# Altium PCB MiniPC.PcbDoc (part 22 of 24)
Units mm, origin at the board's own origin, x right, y up, seen from the top; angles counter-clockwise.
Board outline 175 x 155 mm, 16 copper layers (1_Top, 2_int1_(gnd), 3_int2_(power), 4_int3_(gnd), 5_int4_(sign), 6_int5_(power), 7_int6_(sign), 8_int7_(power), 9_int8_(gnd), 10_int9_(sign), 11_int10_(gnd), 12_int11_(sign), 13_int12_(gnd), 14_int13_(power), 15_int14_(gnd), 16_Bottom), stack 2.008 mm thick; 1046 components, 837 nets, 6010 pads, 4009 vias.
Unrouted connection lines stored in the file: 564.
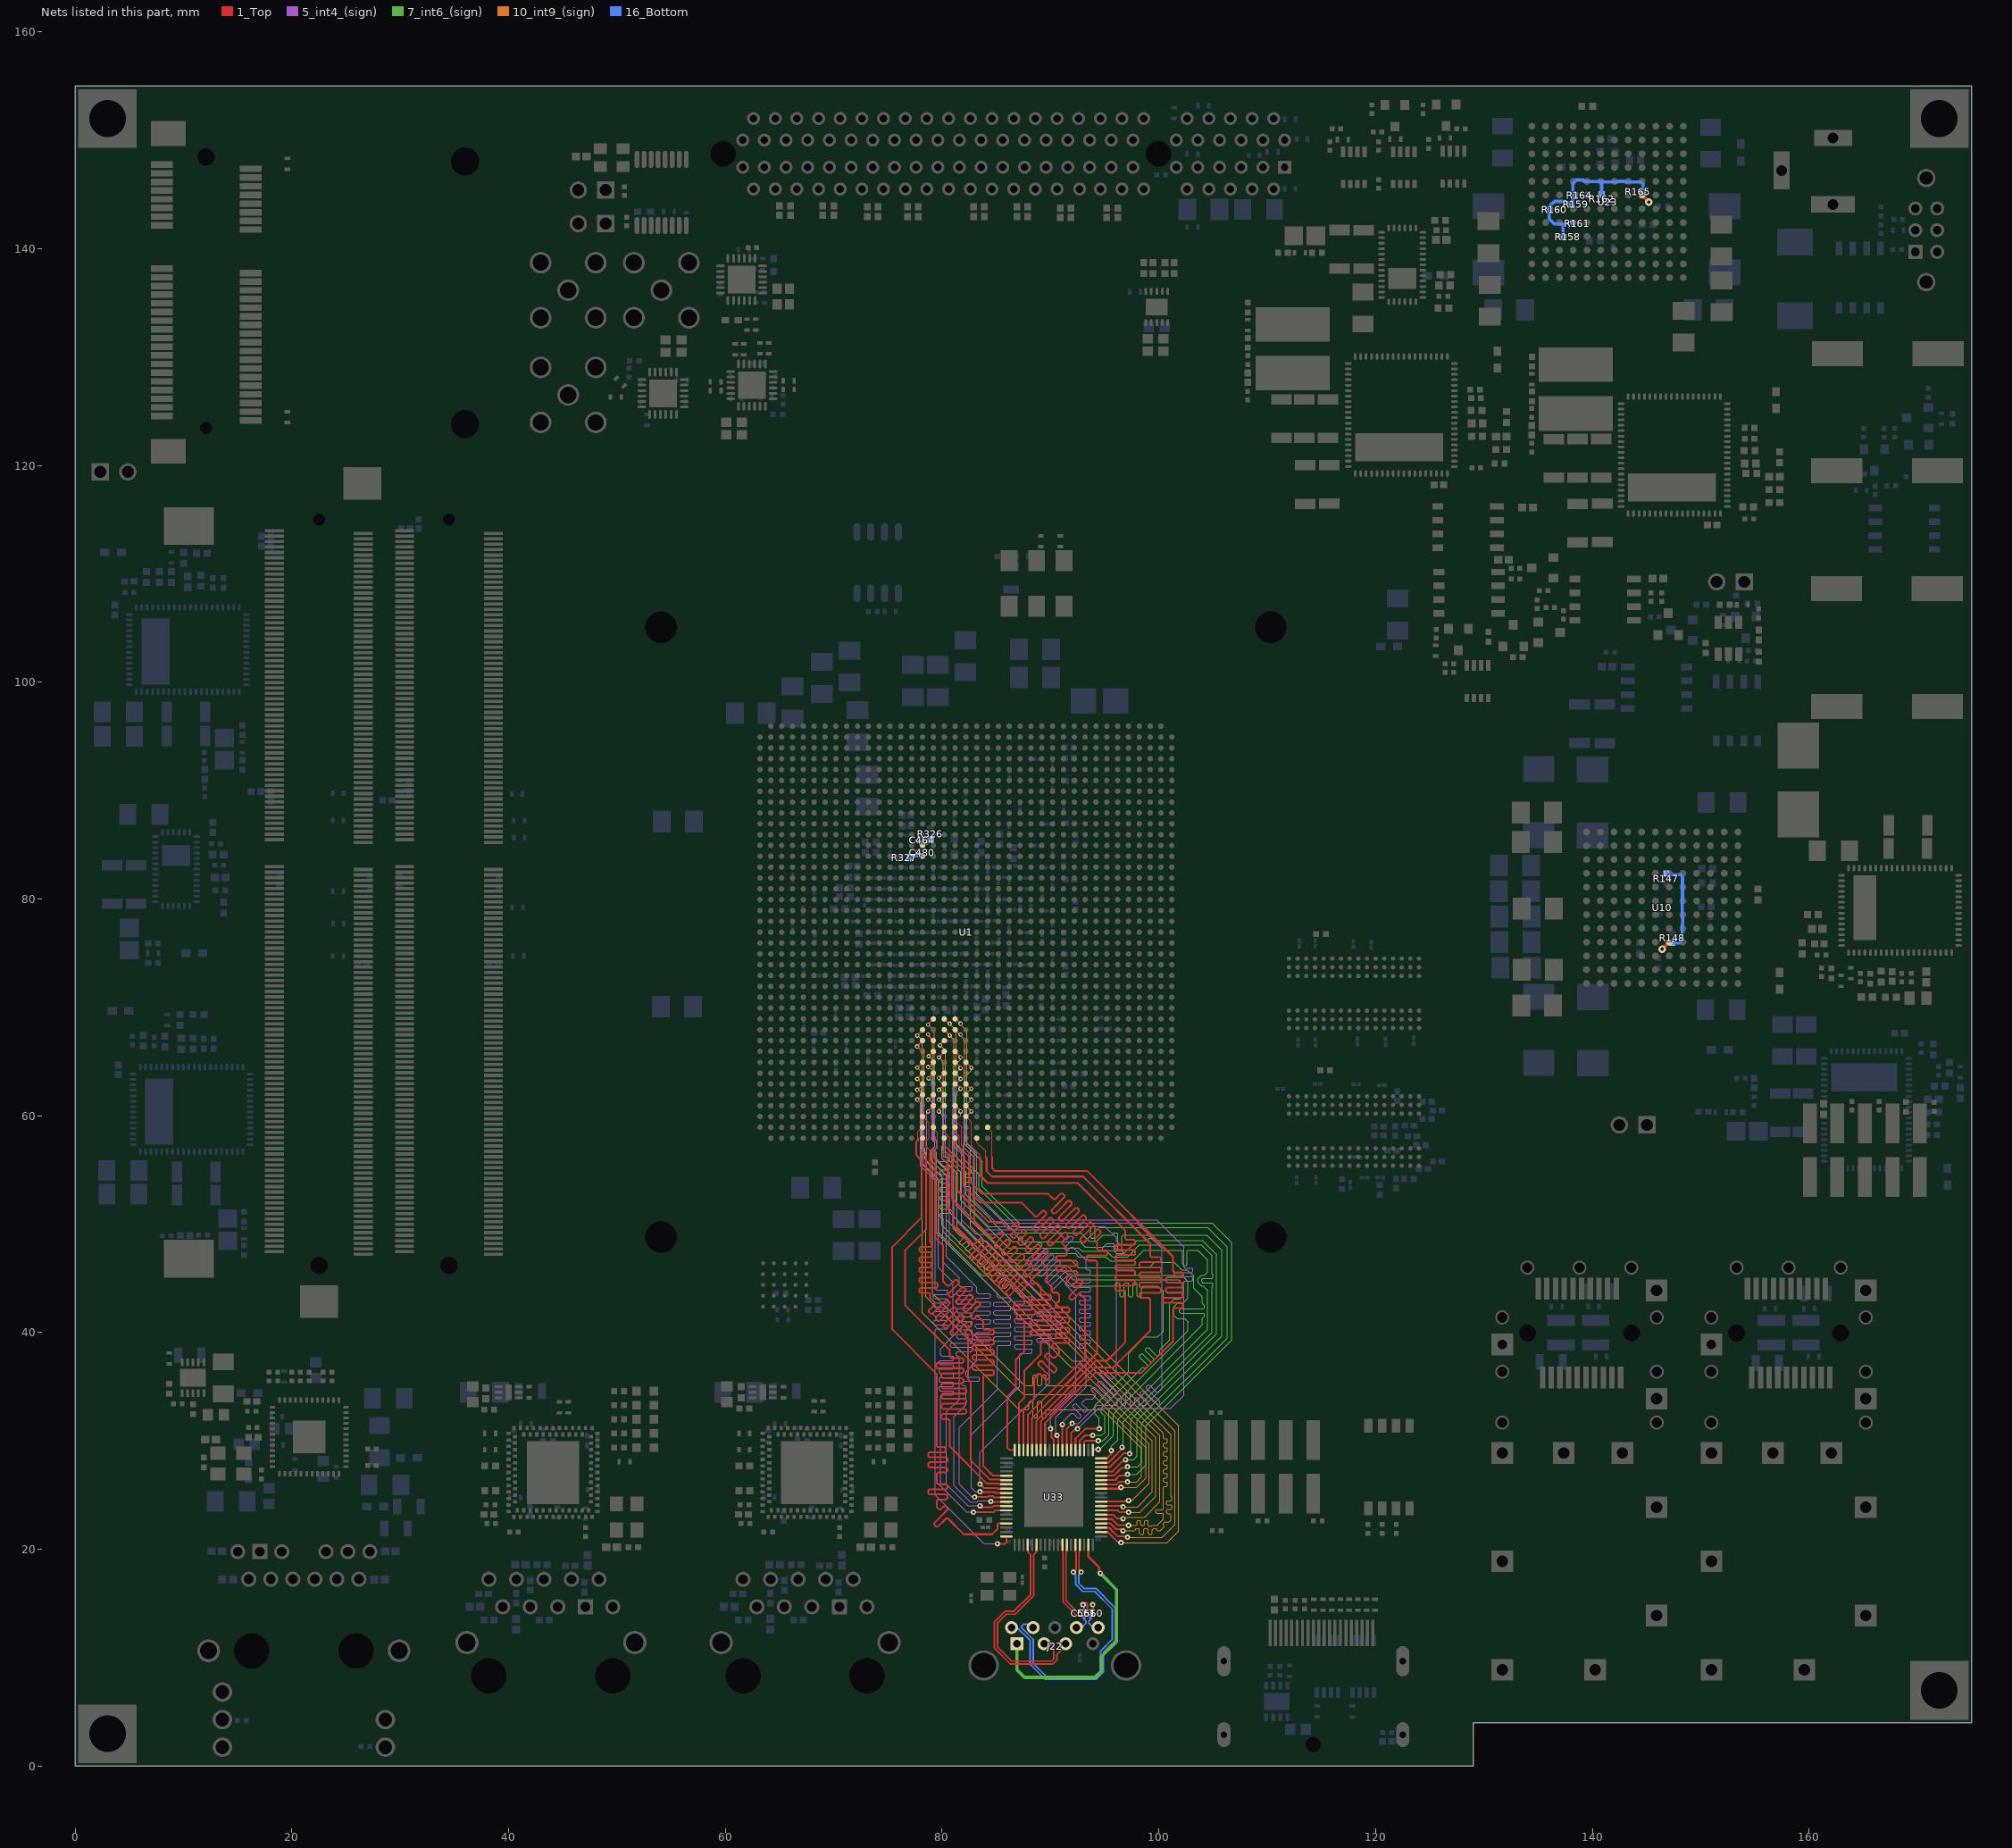
[diagram p34: the nets of this part, all layers, seen from the top]

## Via types
v1: diameter 0.4, hole 0.2, 1_Top to 16_Bottom, tented both sides, 1658 vias
v2: diameter 0.5, hole 0.2, 1_Top to 16_Bottom, tented both sides, 1014 vias
v3: diameter 0.7, hole 0.3, 1_Top to 16_Bottom, tented both sides, 915 vias
v4: diameter 0.6, hole 0.2, 1_Top to 16_Bottom, tented both sides, 278 vias
v5: diameter 0.4, hole 0.2, 1_Top to 16_Bottom, 93 vias
v6: diameter 0.4/0/0/0/0/0/0/0/0/0/0/0/0/0/0/0.4 (per signal layer), hole 0.2, 1_Top to 16_Bottom, tented both sides, 18 vias
v7: diameter 0.4/0/0/0/0/0/0/0/0/0/0/0.4/0.4/0.4/0.4/0.4 (per signal layer), hole 0.2, 1_Top to 16_Bottom, tented both sides, 16 vias
v8: diameter 0.5, hole 0.254, 1_Top to 16_Bottom, tented both sides, 15 vias
v9: diameter 0.5, hole 0.2, 1_Top to 16_Bottom, 2 vias

## Nets (pads, with @x,y where several pads share a name; then routed paths per layer and width w, separated by ;. In a path a pad name is that pad's centre, name@x,y a point inside that pad or via, vN(x,y) a via of type N, cw(c..) or ccw(c..) an arc to the next point about the centre after c; other vN are vias at no path point) (continued)
USB3_BE1: U1.AV17 U33.5 | length 62.9
  1_Top w0.1: U1.AV17@79.194,58.939 79.194,58.806 79.584,58.416 79.584,57.219 79.4,57.035 79.4,56.2
  1_Top w0.17: 79.4,56.2 79.4,48.7 80.1,48 80.1,44.7 80.4,44.4 80.483,44.317 80.649,44.317 81.178,44.846 81.344,44.846 81.51,44.68 81.51,44.513 80.899,43.901 80.612,43.615 80.612,43.449 80.778,43.283 80.944,43.283 81.231,43.569 81.843,44.181 82.009,44.181 82.175,44.015 82.175,43.849 81.563,43.237 81.277,42.95 81.277,42.784 81.443,42.618 81.609,42.618 81.896,42.904 82.507,43.516 82.674,43.516 82.84,43.35 82.84,43.184 82.228,42.572 81.941,42.286 81.941,42.119 82.107,41.953 82.274,41.953 82.56,42.24 83.172,42.852 83.338,42.852 83.504,42.686 83.504,42.519 82.893,41.907 82.606,41.621 82.606,41.455 82.772,41.289 82.938,41.289 83.142,41.492 83.308,41.492 83.557,41.243 83.8,41 83.8,40.765 83.8,40.413 83.918,40.295 84.665,40.295 84.783,40.178 84.783,39.943 84.665,39.825 83.8,39.825 82.935,39.825 82.817,39.708 82.817,39.473 82.935,39.355 83.8,39.355 84.665,39.355 84.783,39.238 84.783,39.003 84.665,38.885 83.8,38.885 82.935,38.885 82.817,38.768 82.817,38.533 82.935,38.415 83.8,38.415 84.665,38.415 84.783,38.298 84.783,38.063 84.665,37.945 83.8,37.945 82.935,37.945 82.817,37.828 82.817,37.593 82.935,37.475 83.8,37.475 84.665,37.475 84.783,37.358 84.783,37.123 84.665,37.005 83.8,37.005 82.935,37.005 82.817,36.888 82.817,36.653 82.935,36.535 83.8,36.535 84.665,36.535 84.783,36.418 84.783,36.183 84.665,36.065 83.918,36.065 83.8,35.948 83.8,35.6 83.8,27.7 84.695,26.805 85.92,26.805 U33.5@85.925,26.8
USB3_BE2: U1.AU16 U33.6 | length 63.5
  1_Top w0.1: U1.AU16@78.194,59.939 78.775,59.358 78.775,57.945 78.525,57.695 78.525,57.143 78.9,56.768
  1_Top w0.17: 78.9,56.768 78.9,48.6 78.9,48.378 78.913,48.365 79.03,48.248 79.03,48.013 78.913,47.895 78.9,47.895 78.017,47.895 77.9,47.778 77.9,47.543 78.017,47.425 78.9,47.425 78.913,47.425 79.03,47.308 79.03,47.073 78.913,46.955 78.9,46.955 78.017,46.955 77.9,46.838 77.9,46.603 78.017,46.485 78.9,46.485 78.913,46.485 79.03,46.368 79.03,46.133 78.913,46.015 78.9,46.015 78.017,46.015 77.9,45.898 77.9,45.663 78.017,45.545 78.9,45.545 78.913,45.545 79.03,45.428 79.03,45.193 78.913,45.075 78.9,45.075 78.017,45.075 77.9,44.958 77.9,44.723 78.017,44.605 78.9,44.605 79.472,44.605 79.589,44.488 79.589,44.253 79.472,44.135 78.9,44.135 78.017,44.135 77.9,44.018 77.9,43.783 78.017,43.665 78.782,43.665 78.9,43.548 78.9,43.2 79.066,43.034 79.315,42.785 79.315,42.618 78.774,42.077 78.774,41.911 78.941,41.745 79.107,41.745 79.731,42.369 80.355,42.993 80.521,42.993 80.687,42.827 80.687,42.661 80.063,42.037 79.439,41.413 79.439,41.247 79.605,41.08 79.772,41.08 80.396,41.704 81.02,42.328 81.186,42.328 81.352,42.162 81.352,41.996 80.728,41.372 80.104,40.748 80.104,40.582 80.27,40.416 80.436,40.416 81.06,41.04 81.684,41.664 81.85,41.664 82.017,41.498 82.017,41.331 81.393,40.707 80.769,40.083 80.769,39.917 80.935,39.751 81.101,39.751 81.725,40.375 82.349,40.999 82.515,40.999 82.681,40.833 82.681,40.667 82.14,40.126 82.14,39.96 82.39,39.71 82.4,39.7 82.4,39.465 82.4,39.2 82.4,35.7 82.65,35.45 82.65,28.203 84.418,26.435 85.305,26.435 85.34,26.4 U33.6@85.925,26.4
USB3_BE3: U1.AW16 U33.7 | length 62.8
  1_Top w0.1: U1.AW16@78.194,57.939 78.196,57.938 78.196,56.596
  1_Top w0.17: 78.196,56.596 78.53,56.261 78.53,49.53 76.6,47.6 76.6,42.5 80.7,38.4 80.7,37.9 80.7,37.783 80.818,37.665 81.848,37.665 81.966,37.548 81.966,37.313 81.848,37.195 80.7,37.195 79.562,37.195 79.445,37.078 79.445,36.843 79.562,36.725 80.7,36.725 81.848,36.725 81.966,36.608 81.966,36.373 81.848,36.255 80.7,36.255 80.052,36.255 79.934,36.138 79.934,35.903 80.052,35.785 80.7,35.785 81.85,35.785 81.967,35.668 81.967,35.433 81.85,35.315 80.7,35.315 80.052,35.315 79.934,35.198 79.934,34.963 80.052,34.845 80.7,34.845 82.098,34.845 82.216,34.728 82.216,34.493 82.098,34.375 80.7,34.375 80.052,34.375 79.934,34.258 79.934,34.023 80.052,33.905 80.7,33.905 82.098,33.905 82.216,33.788 82.216,33.553 82.098,33.435 80.7,33.435 80.052,33.435 79.934,33.318 79.934,33.083 80.052,32.965 80.7,32.965 82.098,32.965 82.216,32.848 82.216,32.613 82.098,32.495 80.7,32.495 80.052,32.495 79.934,32.378 79.934,32.143 80.052,32.025 80.583,32.025 80.7,31.908 80.7,31.6 80.7,29.511 84.146,26.065 85.151,26.065 85.186,26.03 85.895,26.03 U33.7@85.925,26
USB3_CLK: U1.AL17 U33.58 | length 66.8
  1_Top w0.17: v1(78.75,65.5) 78.755,65.5 U1.AL17@79.194,65.939 ; U33.58@93.9,29.175 93.95,29.225 v2(94.4,29.225)
  7_int6_(sign) w0.1: v1(78.75,65.5) 78.8,65.5 79.3,65 79.3,57.878 79.525,57.653 79.525,57.072 79.3,56.847 79.3,56.1 80.7,54.7 80.7,51.1 85.1,46.7 91.9,46.7 92.6,46 99.1,46 99.6,46.5 101.4,46.5 102.1,45.8 102.6,45.8 103.2,45.2 103.2,44.1 104,43.3 104,42.8 104,42.7 104.1,42.6 104.2,42.5 104.2,42.3 104.1,42.2 104,42.2 102.014,42.2 101.914,42.1 101.914,41.9 102.014,41.8 104,41.8 104.1,41.8 104.2,41.7 104.2,41.5 104.1,41.4 104,41.3 104,40.7 95.8,32.5 95.8,30.5 94.525,29.225 v2(94.4,29.225)
USB3_D0: U1.AH19 U33.40 | length 63.8
  1_Top w0.17: U1.AH19@81.194,68.939 81.261,68.939 v1(81.7,68.5) ; U33.40@94.675,21.6 95.284,21.6 96.179,20.704 96.421,20.704 v2(96.5,20.625)
  10_int9_(sign) w0.1: v1(81.7,68.5) 81.7,68.4 82.3,67.8 82.3,57.483 83,56.783 83,50.2 101.8,31.4 101.8,21.7 100.725,20.625 v2(96.5,20.625)
USB3_D1: U1.AJ19 U33.41 | length 63.6
  1_Top w0.17: U1.AJ19@81.194,67.939 81.633,67.5 v1(81.7,67.5) ; U33.41@94.675,22 95.407,22 96.207,21.2 97.025,21.2 v2(97.1,21.125)
  10_int9_(sign) w0.1: v1(81.7,67.5) 81.7,67.4 82.1,67 82.1,57.4 82.6,56.9 82.6,55.3 82.6,55.1 82.7,55 82.7,54.8 82.6,54.7 82.2,54.7 82.1,54.6 82.1,54.4 82.2,54.3 82.6,54.3 82.7,54.2 82.7,54 82.6,53.9 82.2,53.9 82.1,53.8 82.1,53.6 82.2,53.5 82.5,53.5 82.6,53.4 82.6,53.3 82.6,49.8 101.5,30.9 101.5,22.324 100.276,21.1 97.125,21.1 v2(97.1,21.125)
USB3_D2: U1.AH18 U33.42 | length 65.6
  1_Top w0.17: U1.AH18@80.194,68.939 80.633,68.5 v1(80.7,68.5) ; U33.42@94.675,22.4 95.53,22.4 96.055,21.875 96.55,21.875 v2(96.7,21.725)
  10_int9_(sign) w0.1: v1(80.7,68.5) 81.3,67.9 81.3,57.3 81.8,56.8 81.8,49.9 101.1,30.6 101.1,25.1 101.1,24.9 101.2,24.8 101.2,24.6 101.1,24.5 100.8,24.5 100.7,24.4 100.7,24.2 100.8,24.1 101.1,24.1 101.2,24 101.2,23.8 101.1,23.7 100.8,23.7 100.7,23.6 100.7,23.4 100.8,23.3 101,23.3 101.1,23.2 101.1,22.9 101.1,22.7 100.903,22.503 100.761,22.503 100.715,22.549 100.573,22.549 100.432,22.408 100.432,22.266 100.479,22.22 100.479,22.079 100.266,21.866 100.125,21.725 99.9,21.725 99.8,21.825 99.7,21.925 99.5,21.925 99.4,21.825 99.4,21.725 99.4,21.5 99.3,21.4 99.1,21.4 99,21.5 99,21.725 99,21.825 98.9,21.925 98.7,21.925 98.6,21.825 98.6,21.725 98.6,21.5 98.5,21.4 98.3,21.4 98.2,21.5 98.2,21.725 98.2,21.825 98.1,21.925 97.9,21.925 97.8,21.825 97.7,21.725 97.6,21.725 v2(96.7,21.725)
USB3_D3: U1.AJ18 U33.43 | length 65.8
  1_Top w0.17: U1.AJ18@80.194,67.939 80.7,67.433 v1(80.7,67.4) ; U33.43@94.675,22.8 95.653,22.8 96.208,22.245 97.18,22.245 v2(97.2,22.225)
  10_int9_(sign) w0.1: v1(80.7,67.4) 81.1,67 81.1,57.2 81.4,56.9 81.4,49.7 100.4,30.7 100.4,30.4 100.4,30.3 100.5,30.2 100.7,30.2 100.8,30.1 100.8,29.9 100.7,29.8 100.5,29.8 100.4,29.7 100.4,29.5 100.5,29.4 100.7,29.4 100.8,29.3 100.8,29.1 100.7,29 100.5,29 100.4,28.9 100.4,28.7 100.5,28.6 100.7,28.6 100.8,28.5 100.8,28.3 100.7,28.2 100.5,28.2 100.4,28.1 100.4,27.9 100.5,27.8 100.7,27.8 100.8,27.7 100.8,27.5 100.7,27.4 100.5,27.4 100.4,27.3 100.4,27.1 100.5,27 100.7,27 100.8,26.9 100.8,26.7 100.7,26.6 100.5,26.6 100.4,26.5 100.4,26.3 100.5,26.2 100.7,26.2 100.8,26.1 100.8,25.9 100.7,25.8 100.5,25.8 100.4,25.7 100.4,25.5 100.4,24.1 100.4,24.025 100.4,23.762 100.312,23.675 99.799,23.675 99.712,23.587 99.712,23.412 99.799,23.325 100.312,23.325 100.4,23.237 100.4,22.975 100.4,22.8 99.825,22.225 99.725,22.225 99.376,22.225 ; v2(97.2,22.225) 97.8,22.225 97.887,22.225 97.975,22.313 97.975,22.588 98.062,22.675 98.237,22.675 98.325,22.588 98.325,22.313 98.412,22.225 98.587,22.225 98.675,22.313 98.675,22.601 98.762,22.688 98.937,22.688 99.025,22.601 99.025,22.225 ; 99.025,22.224 99.112,22.137 99.287,22.137 99.375,22.224
USB3_D4: U1.AK18 U33.44 | length 65.6
  1_Top w0.17: v1(79.8,66.5) 79.8,66.545 U1.AK18@80.194,66.939 ; U33.44@94.675,23.2 95.777,23.2 96.104,22.872 96.653,22.872 v2(96.7,22.825)
  10_int9_(sign) w0.1: v1(79.8,66.5) 80.3,66 80.3,57.139 81,56.439 81,49.6 81.5,49.1 81.641,48.959 81.717,48.959 81.924,48.752 81.924,48.676 81.607,48.359 81.607,48.217 81.749,48.076 81.89,48.076 82.207,48.393 82.283,48.393 82.49,48.186 82.49,48.11 82.173,47.793 82.173,47.651 82.314,47.51 82.456,47.51 82.773,47.827 82.849,47.827 83.056,47.62 83.056,47.544 82.738,47.227 82.738,47.086 82.88,46.944 83.021,46.944 83.338,47.262 83.414,47.262 83.621,47.054 83.621,46.979 83.304,46.661 83.304,46.52 83.446,46.379 83.587,46.379 83.904,46.696 83.98,46.696 84.187,46.489 84.187,46.413 83.87,46.096 83.87,45.954 84.011,45.813 84.153,45.813 84.47,46.13 84.546,46.13 84.753,45.923 84.753,45.847 84.436,45.53 84.436,45.389 84.577,45.247 84.718,45.247 85.036,45.564 85.111,45.564 85.318,45.357 85.318,45.282 85.001,44.964 85.001,44.823 85.143,44.682 85.284,44.682 85.601,44.999 85.677,44.999 85.884,44.792 85.884,44.716 85.567,44.399 85.567,44.257 85.708,44.116 85.85,44.116 86.167,44.433 86.243,44.433 86.45,44.226 86.45,44.15 86.8,43.8 100.1,30.5 100.1,24.4 98.675,22.975 96.85,22.975 v2(96.7,22.825)
USB3_D5: U1.AL18 U33.45 | length 66.4
  1_Top w0.17: v1(79.7,65.4) 80.194,65.894 U1.AL18@80.194,65.939 ; U33.45@94.675,23.6 96.2,23.6 96.375,23.425 v2(97.2,23.425)
  10_int9_(sign) w0.1: v1(79.7,65.4) 80.1,65 80.1,56.4 80.1,56.3 80.2,56.2 80.6,56.2 80.7,56.1 80.7,55.9 80.6,55.8 80.1,55.8 79.9,55.8 79.8,55.7 79.8,55.5 79.9,55.4 80.1,55.4 80.6,55.4 80.7,55.3 80.7,55.1 80.6,55 80.1,55 79.9,55 79.8,54.9 79.8,54.7 79.9,54.6 80.1,54.6 80.6,54.6 80.7,54.5 80.7,54.3 80.6,54.2 80.1,54.2 79.9,54.2 79.8,54.1 79.8,53.9 79.9,53.8 80.1,53.8 80.6,53.8 80.7,53.7 80.7,53.5 80.6,53.4 80.1,53.4 79.9,53.4 79.8,53.3 79.8,53.1 79.9,53 80.1,53 80.6,53 80.7,52.9 80.7,52.7 80.6,52.6 80.1,52.6 79.9,52.6 79.8,52.5 79.8,52.3 79.9,52.2 80.1,52.2 80.6,52.2 80.7,52.1 80.7,51.9 80.6,51.8 80.1,51.8 79.9,51.8 79.8,51.7 79.8,51.5 79.9,51.4 80.1,51.4 80.6,51.4 80.7,51.3 80.7,51.1 80.6,51 80.1,51 79.9,51 79.8,50.9 79.8,50.7 79.9,50.6 80,50.6 80.1,50.5 80.1,50.4 80.1,49.3 92,37.4 92.6,37.4 99.7,30.3 99.7,24.9 98.225,23.425 v2(97.2,23.425)
USB3_D6: U1.AH17 U33.46 | length 58.3
  1_Top w0.17: v1(78.7,68.4) 78.7,68.445 U1.AH17@79.194,68.939 ; U33.46@94.675,24 96.625,24 v2(96.7,23.925)
  10_int9_(sign) w0.1: v1(78.7,68.4) 79.3,67.8 79.3,57.878 79.525,57.653 79.525,57.072 79.3,56.847 79.3,56.8 79.5,56.6 79.5,49.2 91.9,36.8 92.6,36.8 99.4,30 99.4,25.3 98.025,23.925 v2(96.7,23.925)
USB3_D7: U1.AK17 U33.47 | length 63
  1_Top w0.17: v1(78.7,67.5) 78.7,67.433 U1.AK17@79.194,66.939 ; U33.47@94.675,24.4 94.685,24.41 97.085,24.41 v2(97.2,24.525)
  10_int9_(sign) w0.1: v1(78.7,67.5) 78.7,67.4 79.1,67 79.1,57.795 79.325,57.57 79.325,57.155 79.1,56.93 79.1,43.6 87.6,35.1 88.2,35.1 88.3,35.1 88.4,35.2 88.4,36 88.5,36.1 88.7,36.1 88.8,36 88.8,35.2 88.9,35.1 89.1,35.1 89.2,35.2 89.2,36 89.3,36.1 89.5,36.1 89.6,36 89.6,35.2 89.7,35.1 89.9,35.1 93.7,35.1 99.1,29.7 99.1,26.1 97.525,24.525 v2(97.2,24.525)
USB3_D8: U1.AJ16 U33.50 | length 58.6
  1_Top w0.17: v1(77.7,67.4) 78.194,67.894 U1.AJ16@78.194,67.939 ; U33.50@94.675,25.6 96.375,25.6 v2(96.5,25.725)
  10_int9_(sign) w0.1: v1(77.7,67.4) 78.155,66.945 78.155,66.245 78.35,66.05 78.35,56.75 78.5,56.6 78.5,43.3 87.5,34.3 93.9,34.3 98.8,29.4 98.8,26.6 97.925,25.725 v2(96.5,25.725)
USB3_D9: U1.AK16 U33.51 | length 63.1
  1_Top w0.17: v1(77.7,66.4) 77.7,66.445 U1.AK16@78.194,66.939 ; U33.51@94.675,26 96.089,26 96.314,26.225 v2(97.1,26.225)
  10_int9_(sign) w0.1: v1(77.7,66.4) 78.15,65.95 78.15,41.85 87.1,32.9 87.8,32.9 87.9,32.9 88,33 88,33.566 88.1,33.666 88.3,33.666 88.4,33.566 88.4,32.9 88.4,32.234 88.5,32.134 88.7,32.134 88.8,32.234 88.8,32.9 88.8,33.566 88.9,33.666 89.1,33.666 89.2,33.566 89.2,32.9 89.2,32.234 89.3,32.134 89.5,32.134 89.6,32.234 89.6,32.9 94.8,32.9 98.4,29.3 98.4,26.7 97.925,26.225 v2(97.1,26.225)
USB3_D10: U1.AP20 U33.52 | length 64.1
  1_Top w0.17: U1.AP20@82.194,62.939 82.633,62.5 v1(82.7,62.5) ; U33.52@94.675,26.4 95.966,26.4 96.391,26.825 96.993,26.825 97.096,26.929 v2@97.1,26.932
  7_int6_(sign) w0.1: v1(82.7,62.5) 82.3,62.1 82.3,57.2 83.7,55.8 83.7,53.5 87.1,50.1 104.9,50.1 106.7,48.3 106.7,39.3 98.8,31.4 98.8,27.8 97.925,26.925 v2(97.1,26.925)
USB3_D11: U1.AM20 U33.53 | length 67.3
  1_Top w0.17: U1.AM20@82.194,64.939 v1(82.7,64.433) ; U33.53@94.675,26.8 95.843,26.8 96.567,27.525 97,27.525 v2(97.1,27.625)
  7_int6_(sign) w0.1: v1(82.7,64.433) 82.7,64.2 82.1,63.6 82.1,57.554 82,57.454 82,56 83.4,54.6 83.4,53.3 87,49.7 93.1,49.7 93.3,49.7 93.4,49.8 93.6,49.8 93.7,49.7 93.7,48.817 93.8,48.717 94,48.717 94.1,48.817 94.1,49.7 94.2,49.8 94.4,49.8 94.5,49.7 95.4,49.7 104.5,49.7 106.3,47.9 106.3,39.5 98.4,31.6 98.4,28 98.025,27.625 v2(97.1,27.625)
USB3_D12: U1.AM19 U33.54 | length 67.4
  1_Top w0.17: U1.AM19@81.194,64.939 81.7,64.433 v1(81.7,64.4) ; U33.54@94.675,27.2 95.719,27.2 96.794,28.275 v2(96.931,28.275)
  7_int6_(sign) w0.1: v1(81.7,64.4) 81.3,64 81.3,57.339 81.4,57.239 81.4,56.1 82.9,54.6 82.9,53.089 86.789,49.2 92.8,49.2 93.583,48.417 94.217,48.417 94.793,48.993 95.6,48.993 95.7,48.993 95.8,49.093 95.9,49.193 96.1,49.193 96.2,49.093 96.2,48.993 96.2,47.739 96.3,47.639 96.5,47.639 96.6,47.739 96.6,48.893 96.7,48.993 96.8,48.993 104.407,48.993 105.8,47.6 105.8,39.7 98,31.9 98,28.6 97.675,28.275 v2(96.931,28.275)
USB3_D13: U1.AL19 U33.55 | length 67.1
  1_Top w0.17: U1.AL19@81.194,65.939 81.7,65.433 v1(81.7,65.4) ; U33.55@94.675,27.6 95.475,27.6 96.737,28.863 97.263,28.863 v2(97.3,28.825)
  7_int6_(sign) w0.1: v1(81.7,65.4) 81.7,65.2 81.1,64.6 81.1,55.9 82.2,54.8 82.2,52.7 86.5,48.4 86.9,48.4 86.987,48.4 87.075,48.488 87.075,48.732 87.162,48.82 87.337,48.82 87.425,48.732 87.425,48.4 87.425,48.268 87.512,48.18 87.687,48.18 87.775,48.268 87.775,48.312 87.862,48.4 88.5,48.4 92.7,48.4 93.2,47.9 94.9,47.9 95.2,48.2 95.8,48.2 95.9,48.1 95.9,47.5 96.1,47.3 96.8,47.3 98,48.5 98.8,48.5 98.907,48.5 99,48.593 99.1,48.693 99.3,48.693 99.4,48.593 99.493,48.5 99.6,48.5 104,48.5 105.3,47.2 105.3,39.9 97.4,32 97.4,28.925 v2(97.3,28.825)
USB3_D14: U1.AN18 U33.56 | length 64.7
  1_Top w0.17: v1(79.7,63.5) 79.755,63.5 U1.AN18@80.194,63.939 ; U33.56@94.675,28 95.323,28 96.6,29.277 v2(96.6,29.425)
  7_int6_(sign) w0.1: v1(79.7,63.5) 79.7,63.288 80.3,62.688 80.3,57.2 80.3,56.2 81.7,54.8 81.7,52.2 86.1,47.8 92.6,47.8 92.9,47.5 95.2,47.5 95.7,47 97.1,47 98.2,48.1 103.9,48.1 104.9,47.1 104.9,45.6 104.9,45.4 105,45.3 105,45.1 104.9,45 104.049,45 103.949,44.9 103.949,44.7 104.049,44.6 104.9,44.6 105,44.5 105,44.3 104.9,44.2 104.9,44 104.9,40 96.7,31.8 96.7,29.525 v2(96.6,29.425)
USB3_D15: U1.AP18 U33.57 | length 64.6
  1_Top w0.17: v1(79.7,62.4) 80.194,62.894 U1.AP18@80.194,62.939 ; U33.57@94.675,28.4 95.2,28.4 95.6,28.8 v2(95.6,29.125)
  7_int6_(sign) w0.1: v1(79.7,62.4) 79.8,62.4 80.1,62.1 80.1,57.283 80,57.183 80,56.076 81.3,54.776 81.3,51.7 85.7,47.3 92.3,47.3 92.6,47 95.1,47 95.5,46.6 97.6,46.6 98.6,47.6 101.2,47.6 101.4,47.6 101.6,47.6 101.8,47.6 102.1,47.6 102.2,47.5 102.2,46.319 102.3,46.219 102.5,46.219 102.6,46.319 102.6,47.5 102.7,47.6 103.6,47.6 104.5,46.7 104.5,45.6 104.2,45.3 103.925,45.3 103.6,44.975 103.6,44.625 103.925,44.3 104.1,44.3 104.5,43.9 104.5,40.3 96.2,32 96.2,30.1 95.6,29.5 v2(95.6,29.125)
USB3_D16: U1.AM17 U33.60 | length 63.2
  1_Top w0.17: v1(78.7,64.5) 78.755,64.5 U1.AM17@79.194,64.939 ; U33.60@93.115,28.81 93.1,28.825 U33.60@93.1,29.175 93.1,29.912 93.213,30.025 v2(94.4,30.025)
  7_int6_(sign) w0.1: v1(78.7,64.5) 78.8,64.5 79.1,64.2 79.1,57.795 79.325,57.57 79.325,57.155 79.095,56.925 79.071,56.925 78.9,56.754 78.9,55.983 80.383,54.5 80.383,50.4 84.583,46.2 91.5,46.2 92.4,45.3 102.1,45.3 102.7,44.7 102.7,43.2 102.2,42.7 101.7,42.7 101.4,42.4 101.4,41.6 101.7,41.3 102.4,41.3 102.7,41 102.7,40.2 95.4,32.9 95.4,30.6 94.825,30.025 v2(94.4,30.025)
USB3_D17: U1.AM16 U33.61 | length 66.2
  1_Top w0.17: v1(77.7,64.445) U1.AM16@78.194,64.939 ; U33.61@92.7,29.175 92.7,30.038 93.187,30.525 v2(93.9,30.525)
  7_int6_(sign) w0.1: v1(77.7,64.445) 78.3,63.845 78.3,60.039 78.3,57.085 78.4,56.985 78.4,56 80,54.4 80,49.9 84.1,45.8 91.2,45.8 92.1,44.9 101.8,44.9 102.2,44.5 102.2,43.3 102,43.1 101.4,43.1 101,42.7 101,39.3 100.1,38.4 100.029,38.329 100.029,38.188 100.067,38.151 100.067,38.009 99.925,37.868 99.784,37.868 99.676,37.976 99.049,38.603 98.907,38.603 98.766,38.461 98.766,38.32 99.393,37.693 99.501,37.585 99.501,37.444 99.359,37.302 99.218,37.302 99.11,37.41 98.483,38.037 98.341,38.037 98.2,37.896 98.2,37.754 98.827,37.127 98.935,37.019 98.935,36.878 98.794,36.736 98.652,36.736 98.589,36.8 98.5,36.8 94.7,33 94.7,32.6 95,32.3 95,30.8 94.725,30.525 v2(93.9,30.525)
USB3_D18: U1.AN16 U33.62 | length 65.5
  1_Top w0.17: v1(77.7,63.4) 77.7,63.445 U1.AN16@78.194,63.939 ; U33.62@92.3,29.175 92.3,30.225 93.2,31.125 v2(94.5,31.125)
  7_int6_(sign) w0.1: v1(77.7,63.4) 78.1,63 78.1,56.961 78.05,56.911 78.05,55.65 79.7,54 79.7,49.2 83.6,45.3 90.7,45.3 91.7,44.3 95.8,44.3 95.9,44.3 96,44.4 96,44.5 96.1,44.6 96.3,44.6 96.4,44.5 96.4,44.3 96.4,43.4 96.5,43.3 96.7,43.3 96.8,43.4 96.8,44.3 96.8,44.5 96.9,44.6 97.1,44.6 97.2,44.5 97.2,44.3 97.2,43.4 97.3,43.3 97.5,43.3 97.6,43.4 97.6,44.3 97.6,44.5 97.7,44.6 97.9,44.6 98,44.5 98,44.3 98,43.4 98.1,43.3 98.3,43.3 98.4,43.4 98.4,44.2 98.5,44.3 98.7,44.3 99.9,44.3 100.4,43.8 100.4,40.1 99.9,39.6 98.7,39.6 97.2,38.1 97.2,36.4 94.1,33.3 94.1,32.5 94.5,32.1 v2(94.5,31.125)
USB3_D19: U1.AT20 U33.63 | length 61.8
  1_Top w0.17: U1.AT20@82.194,60.939 82.7,60.433 v1(82.7,60.4) ; U33.63@91.9,29.175 91.9,30.725 92.175,31 92.375,31 v2(92.5,31.125)
  5_int4_(sign) w0.1: v1(82.7,60.4) 82.25,59.95 82.25,57.489 83.2,56.539 83.2,52.6 85.4,50.4 99.79,50.4 102.3,47.89 102.3,46.16 102.3,46.06 102.4,45.96 103.042,45.96 103.142,45.86 103.142,45.66 103.042,45.56 102.3,45.56 101.558,45.56 101.458,45.46 101.458,45.26 101.558,45.16 102.3,45.16 103.042,45.16 103.142,45.06 103.142,44.86 103.042,44.76 102.4,44.76 102.3,44.66 102.3,43.56 102.3,34.23 101.07,33 94.4,33 92.525,31.125 v2(92.5,31.125)
USB3_D20: U1.AR20 U33.64 | length 65.1
  1_Top w0.17: U1.AR20@82.194,61.939 82.261,61.939 v1(82.7,61.5) ; U33.64@91.5,29.175 91.5,31.125 v2(92,31.625)
  5_int4_(sign) w0.1: v1(82.7,61.5) 82.2,61 82.2,60.183 82.05,60.033 82.05,57.05 82.9,56.2 82.9,52.2 85,50.1 97.97,50.1 100.3,47.77 100.3,37.01 100.3,36.81 100.3,36.41 100.3,36.01 100.3,35.61 100.3,35.21 100.3,34.84 100.159,34.699 99.946,34.486 99.805,34.486 99.13,35.161 98.989,35.161 98.848,35.02 98.848,34.878 99.593,34.133 100.072,33.654 100.072,33.512 99.931,33.371 99.789,33.371 99.31,33.85 98.565,34.595 98.423,34.595 98.282,34.454 98.282,34.312 98.957,33.638 98.957,33.496 98.76,33.3 98.56,33.3 98.26,33.3 98.16,33.4 98.16,33.91 98.06,34.01 97.86,34.01 97.76,33.91 97.76,33.4 97.66,33.3 97.46,33.3 97.36,33.4 97.36,34.354 97.26,34.454 97.06,34.454 96.96,34.354 96.96,33.4 96.86,33.3 96.66,33.3 96.56,33.4 96.56,33.862 96.46,33.962 96.26,33.962 96.16,33.862 96.16,33.4 96.06,33.3 95.14,33.3 94.276,33.3 92.601,31.625 v2(92,31.625)
USB3_D21: U1.AT19 U33.65 | length 64.1
  1_Top w0.17: U1.AT19@81.194,60.939 81.7,60.433 v1(81.7,60.4) ; U33.65@91.1,29.175 v2(91.1,31.525)
  5_int4_(sign) w0.1: v1(81.7,60.4) 81.7,60.045 81.35,59.695 81.35,57.35 82.5,56.2 82.5,51.6 84.3,49.8 95.03,49.8 96.07,48.76 96.07,48.56 96.07,48.46 96.17,48.36 96.222,48.36 96.322,48.26 96.322,48.06 96.222,47.96 96.07,47.96 94.916,47.96 94.816,47.86 94.816,47.66 94.916,47.56 96.07,47.56 96.606,47.56 96.706,47.46 96.706,47.26 96.606,47.16 96.17,47.16 96.07,47.06 96.07,46.87 96.07,36.07 95.929,35.929 95.716,35.716 95.575,35.716 94.83,36.462 94.688,36.462 94.547,36.32 94.547,36.179 95.363,35.363 96.179,34.547 96.179,34.405 96.037,34.264 95.896,34.264 95.08,35.08 94.638,35.522 94.497,35.522 94.355,35.381 94.355,35.239 94.797,34.797 95.613,33.981 95.613,33.84 95.472,33.698 95.33,33.698 94.514,34.514 94.081,34.948 93.939,34.948 93.798,34.807 93.798,34.665 94.161,34.302 94.161,34.161 93.949,33.949 93.9,33.9 93.28,33.9 93.139,33.759 92.926,33.546 92.926,33.405 93.371,32.961 93.371,32.819 93.229,32.678 93.088,32.678 92.573,33.193 92.352,33.414 92.211,33.414 92.069,33.272 92.069,33.131 92.29,32.91 92.805,32.395 92.805,32.254 92.664,32.112 92.522,32.112 92.078,32.557 91.936,32.557 91.78,32.4 91.1,31.72 v2(91.1,31.525)
USB3_D22: U1.AP19 U33.66 | length 66.4
  1_Top w0.17: U1.AP19@81.194,62.939 81.261,62.939 v1(81.7,62.5) ; v2(90.6,30.525) 90.7,30.425 U33.66@90.7,29.175
  5_int4_(sign) w0.1: v1(81.7,62.5) 81.2,62 81.2,60.172 81.15,60.122 81.15,57.15 82.1,56.2 82.1,50.9 83.5,49.5 90.43,49.5 91.27,48.66 91.341,48.589 91.482,48.589 91.802,48.909 91.944,48.909 92.085,48.768 92.085,48.626 91.694,48.236 91.304,47.845 91.304,47.704 91.445,47.562 91.586,47.562 91.906,47.882 92.048,47.882 92.215,47.715 93.28,46.65 93.28,45.98 93.28,45.88 93.38,45.78 93.603,45.78 93.703,45.68 93.703,45.48 93.603,45.38 93.28,45.38 92.43,45.38 92.33,45.28 92.33,45.08 92.43,44.98 93.28,44.98 93.606,44.98 93.706,44.88 93.706,44.68 93.606,44.58 93.28,44.58 92.126,44.58 92.026,44.48 92.026,44.28 92.126,44.18 93.28,44.18 93.606,44.18 93.706,44.08 93.706,43.88 93.606,43.78 93.28,43.78 92.758,43.78 92.658,43.68 92.658,43.48 92.758,43.38 93.28,43.38 93.606,43.38 93.706,43.28 93.706,43.08 93.606,42.98 93.28,42.98 92.76,42.98 92.66,42.88 92.66,42.68 92.76,42.58 93.28,42.58 93.606,42.58 93.706,42.48 93.706,42.28 93.606,42.18 93.28,42.18 92.76,42.18 92.66,42.08 92.66,41.88 92.76,41.78 93.28,41.78 93.606,41.78 93.706,41.68 93.706,41.48 93.606,41.38 93.28,41.38 92.76,41.38 92.66,41.28 92.66,41.08 92.76,40.98 93.28,40.98 93.606,40.98 93.706,40.88 93.706,40.68 93.606,40.58 93.28,40.58 92.76,40.58 92.66,40.48 92.66,40.28 92.76,40.18 93.28,40.18 93.606,40.18 93.706,40.08 93.706,39.88 93.606,39.78 93.28,39.78 92.76,39.78 92.66,39.68 92.66,39.48 92.76,39.38 93.28,39.38 93.606,39.38 93.706,39.28 93.706,39.08 93.606,38.98 93.28,38.98 92.76,38.98 92.66,38.88 92.66,38.68 92.76,38.58 93.18,38.58 93.28,38.48 93.28,38.18 93.28,37.78 93.28,37.48 93.18,37.38 92.76,37.38 92.66,37.28 92.66,37.08 92.76,36.98 93.18,36.98 93.28,36.88 93.28,36.58 93.28,36.33 93.28,34.98 90.5,32.2 90.5,30.625 v2(90.6,30.525)
USB3_D23: U1.AN19 U33.67 | length 66
  1_Top w0.17: U1.AN19@81.194,63.939 81.194,63.906 v1(81.7,63.4) ; v2(90,31.125) 90.1,31.025 90.1,30.318 90.3,30.118 U33.67@90.3,29.175
  5_int4_(sign) w0.1: v1(81.7,63.4) 81,62.7 81,60.255 80.95,60.205 80.95,56.55 81.8,55.7 81.8,50.4 83.1,49.1 86.71,49.1 88.07,47.74 88.141,47.669 88.282,47.669 88.919,48.306 89.06,48.306 89.202,48.164 89.202,48.023 88.494,47.316 87.787,46.608 87.787,46.467 87.928,46.326 88.07,46.326 88.777,47.033 89.484,47.74 89.626,47.74 89.767,47.599 89.767,47.457 89.06,46.75 88.353,46.043 88.353,45.901 88.494,45.76 88.636,45.76 89.343,46.467 90.05,47.174 90.191,47.174 90.333,47.033 90.333,46.892 89.626,46.184 88.918,45.477 88.918,45.336 89.06,45.194 89.201,45.194 89.908,45.902 90.616,46.609 90.757,46.609 90.899,46.467 90.899,46.326 90.191,45.619 89.484,44.911 89.484,44.77 89.625,44.629 89.767,44.629 90.474,45.336 91.181,46.043 91.323,46.043 91.464,45.902 91.464,45.76 90.757,45.053 90.05,44.346 90.05,44.204 90.191,44.063 90.333,44.063 91.04,44.77 91.747,45.477 91.889,45.477 92.03,45.336 92.03,45.195 91.393,44.558 91.393,44.417 91.55,44.26 92.36,43.45 92.36,34.76 90,32.4 v2(90,31.125)
USB3_D24: U1.AV22 U33.69 | length 60
  1_Top w0.1: U1.AV22@84.194,58.939 84.6,58.533 84.6,56.2
  1_Top w0.17: 84.6,56.2 84.6,55.2 84.9,54.9 93.4,54.9 101.3,47 101.3,45.8 101.3,45.683 101.418,45.565 102.11,45.565 102.228,45.448 102.228,45.213 102.11,45.095 101.3,45.095 100.755,45.095 100.638,44.978 100.638,44.743 100.755,44.625 101.3,44.625 102.11,44.625 102.228,44.508 102.228,44.273 102.11,44.155 101.3,44.155 100.755,44.155 100.638,44.038 100.638,43.803 100.755,43.685 101.3,43.685 102.11,43.685 102.228,43.568 102.228,43.333 102.11,43.215 101.3,43.215 100.49,43.215 100.372,43.098 100.372,42.863 100.49,42.745 101.3,42.745 102.11,42.745 102.228,42.628 102.228,42.393 102.11,42.275 101.418,42.275 101.3,42.158 101.3,41.2 101.3,39.2 98.4,36.3 94.147,36.3 89.5,31.653 U33.69@89.5,29.175
USB3_D25: U1.AW21 U33.70 | length 60.2
  1_Top w0.1: U1.AW21@83.194,57.939 83.194,57.545 84,56.739 84,56.2
  1_Top w0.17: 84,56.2 84.1,56.1 84.1,54.9 84.6,54.4 93,54.4 99.2,48.2 99.2,47.2 99.2,47.083 99.318,46.965 100.078,46.965 100.196,46.848 100.196,46.613 100.078,46.495 99.2,46.495 98.322,46.495 98.204,46.378 98.204,46.143 98.322,46.025 99.2,46.025 100.078,46.025 100.196,45.908 100.196,45.673 100.078,45.555 99.2,45.555 98.322,45.555 98.204,45.438 98.204,45.203 98.322,45.085 99.2,45.085 100.078,45.085 100.196,44.968 100.196,44.733 100.078,44.615 99.2,44.615 98.322,44.615 98.204,44.498 98.204,44.263 98.322,44.145 99.2,44.145 100.078,44.145 100.196,44.028 100.196,43.793 100.078,43.675 99.2,43.675 98.322,43.675 98.204,43.558 98.204,43.323 98.322,43.205 99.082,43.205 99.2,43.088 99.2,42 99.2,40.2 95.8,36.8 94.123,36.8 89.1,31.777 U33.70@89.1,29.175
USB3_D26: U1.AU20 U33.71 | length 62.3
  1_Top w0.1: U1.AU20@82.194,59.939 82.7,59.433 82.7,57.2 83.5,56.4 83.5,56.2
  1_Top w0.17: 83.5,56.2 83.5,54.5 84.2,53.8 92.5,53.8 96.9,49.4 96.9,48.8 96.9,48.683 97.017,48.565 97.688,48.565 97.806,48.448 97.806,48.213 97.688,48.095 96.9,48.095 96.112,48.095 95.994,47.978 95.994,47.743 96.112,47.625 96.9,47.625 97.688,47.625 97.806,47.508 97.806,47.273 97.688,47.155 96.9,47.155 96.112,47.155 95.994,47.038 95.994,46.803 96.112,46.685 96.9,46.685 97.688,46.685 97.806,46.568 97.806,46.333 97.688,46.215 96.9,46.215 96.112,46.215 95.994,46.098 95.994,45.863 96.112,45.745 96.9,45.745 97.688,45.745 97.806,45.628 97.806,45.393 97.688,45.275 96.9,45.275 96.112,45.275 95.994,45.158 95.994,44.923 96.112,44.805 96.9,44.805 97.688,44.805 97.806,44.688 97.806,44.453 97.688,44.335 96.9,44.335 96.112,44.335 95.994,44.218 95.994,43.983 96.112,43.865 96.835,43.865 96.9,43.8 96.9,39.1 95.2,37.4 94.2,37.4 88.7,31.9 U33.71@88.7,29.175
USB3_D27: U1.AU19 U33.72 | length 64.8
  1_Top w0.1: U1.AU19@81.194,59.939 81.194,59.561 81.8,58.955 81.8,57.3 82.5,56.6 82.5,56.2
  1_Top w0.17: 82.5,56.2 82.5,54 83.7,52.8 89.8,52.8 90.2,52.4 90.283,52.317 90.449,52.317 90.954,52.821 91.12,52.821 91.286,52.655 91.286,52.489 90.699,51.901 90.111,51.314 90.111,51.148 90.277,50.982 90.443,50.982 91.031,51.569 91.619,52.157 91.785,52.157 91.951,51.991 91.951,51.824 91.363,51.237 90.776,50.649 90.776,50.483 90.942,50.317 91.108,50.317 91.696,50.904 92.283,51.492 92.449,51.492 92.616,51.326 92.616,51.16 92.028,50.572 91.44,49.984 91.44,49.818 91.606,49.652 91.773,49.652 92.36,50.24 92.948,50.827 93.114,50.827 93.28,50.661 93.28,50.495 92.693,49.907 92.105,49.32 92.105,49.154 92.271,48.987 92.437,48.987 93.025,49.575 93.613,50.163 93.779,50.163 93.945,49.997 93.945,49.83 93.357,49.243 92.77,48.655 92.77,48.489 92.936,48.323 93.102,48.323 93.69,48.91 94.277,49.498 94.443,49.498 94.61,49.332 94.61,49.166 94.105,48.661 94.105,48.495 94.3,48.3 94.3,48.065 94.3,47.713 94.417,47.595 95.131,47.595 95.249,47.478 95.249,47.243 95.131,47.125 94.3,47.125 93.469,47.125 93.351,47.008 93.351,46.773 93.469,46.655 94.182,46.655 94.3,46.538 94.3,45.7 94.3,38.1 88.3,32.1 U33.72@88.3,29.175
USB3_D28: U1.AV19 U33.73 | length 62.2
  1_Top w0.1: U1.AV19@81.194,58.939 81.194,58.491 81.584,58.101 81.584,56.916 82,56.5 82,56.2
  1_Top w0.17: 82,56.2 82,53.5 83.5,52 87.3,52 88.5,50.8 88.583,50.717 88.749,50.717 89.27,51.238 89.436,51.238 89.602,51.071 89.602,50.905 88.999,50.301 88.395,49.698 88.395,49.532 88.561,49.365 88.727,49.365 89.331,49.969 89.935,50.573 90.101,50.573 90.267,50.407 90.267,50.241 89.663,49.637 89.059,49.033 89.059,48.867 89.226,48.701 89.392,48.701 89.996,49.304 90.599,49.908 90.765,49.908 90.932,49.742 90.932,49.576 90.328,48.972 89.724,48.368 89.724,48.202 89.89,48.036 90.056,48.036 90.66,48.64 91.264,49.244 91.43,49.244 91.596,49.077 91.596,48.911 91.076,48.391 91.076,48.224 91.325,47.975 91.5,47.8 91.5,47.565 91.5,47.213 91.382,47.095 90.646,47.095 90.529,46.978 90.529,46.743 90.646,46.625 91.5,46.625 92.354,46.625 92.471,46.508 92.471,46.273 92.354,46.155 91.5,46.155 90.646,46.155 90.529,46.038 90.529,45.803 90.646,45.685 91.5,45.685 92.354,45.685 92.471,45.568 92.471,45.333 92.354,45.215 91.618,45.215 91.5,45.098 91.5,44.8 91.666,44.634 91.915,44.385 92.082,44.385 92.602,44.905 92.768,44.905 92.935,44.739 92.935,44.573 92.331,43.969 91.727,43.365 91.727,43.199 91.893,43.033 92.059,43.033 92.58,43.554 92.746,43.554 92.996,43.304 93.2,43.1 93.2,37.7 87.9,32.4 U33.73@87.9,29.175
USB3_D29: U1.AW19 U33.74 | length 61.8
  1_Top w0.1: U1.AW19@81.194,57.939 81.194,56.506 81.4,56.3 81.4,56.2
  1_Top w0.17: 81.4,56.2 81.4,53.1 84.3,50.2 85.5,50.2 86,49.7 86.083,49.617 86.249,49.617 86.758,50.126 86.924,50.126 87.09,49.959 87.09,49.793 86.499,49.201 86.361,49.064 86.361,48.897 86.527,48.731 86.693,48.731 86.831,48.869 87.423,49.461 87.589,49.461 87.755,49.295 87.755,49.129 87.163,48.537 87.025,48.399 87.025,48.233 87.191,48.067 87.358,48.067 87.496,48.204 88.087,48.796 88.253,48.796 88.42,48.63 88.42,48.464 87.828,47.872 87.69,47.734 87.69,47.568 87.856,47.402 88.022,47.402 88.16,47.54 88.752,48.132 88.918,48.132 89.084,47.965 89.084,47.799 88.493,47.207 88.355,47.07 88.355,46.903 88.521,46.737 88.687,46.737 88.825,46.875 89.417,47.467 89.583,47.467 89.749,47.301 89.749,47.135 89.24,46.626 89.24,46.46 89.49,46.21 89.7,46 89.7,44.6 89.866,44.434 90.116,44.184 90.116,44.019 90.116,43.853 90.283,43.687 90.449,43.687 90.613,43.687 90.8,43.5 90.8,43.265 90.8,42.913 90.682,42.795 90.602,42.795 90.484,42.678 90.484,42.443 90.602,42.325 90.8,42.325 91.637,42.325 91.754,42.208 91.754,41.973 91.637,41.855 90.8,41.855 90.602,41.855 90.484,41.738 90.484,41.503 90.602,41.385 90.8,41.385 91.637,41.385 91.754,41.268 91.754,41.033 91.637,40.915 90.8,40.915 90.602,40.915 90.484,40.798 90.484,40.563 90.602,40.445 90.8,40.445 91.637,40.445 91.754,40.328 91.754,40.093 91.637,39.975 90.8,39.975 90.602,39.975 90.484,39.858 90.484,39.623 90.602,39.505 90.8,39.505 91.637,39.505 91.754,39.388 91.754,39.153 91.637,39.035 90.8,39.035 90.29,39.035 90.173,38.918 90.173,38.683 90.29,38.565 90.682,38.565 90.8,38.448 90.8,38.1 90.634,37.934 90.385,37.685 90.218,37.685 89.83,38.073 89.663,38.073 89.497,37.907 89.497,37.741 89.969,37.269 90.561,36.677 90.561,36.511 90.395,36.345 90.229,36.345 89.637,36.937 89.214,37.36 89.048,37.36 88.881,37.194 88.881,37.028 89.304,36.604 89.896,36.013 89.896,35.847 89.73,35.68 89.564,35.68 89.055,36.189 88.889,36.189 88.5,35.8 88.5,33.9 87.5,32.9 U33.74@87.5,29.175
USB3_D30: U1.AV18 U33.75 | length 62.4
  1_Top w0.1: U1.AV18@80.194,58.939 80.194,58.506 80.7,58 80.7,56.5 80.9,56.3 80.9,56.2
  1_Top w0.17: 80.9,56.2 80.9,52.4 84.5,48.8 84.583,48.717 84.749,48.717 85.268,49.236 85.434,49.236 85.601,49.07 85.601,48.904 84.999,48.301 84.851,48.154 84.851,47.987 85.017,47.821 85.183,47.821 85.331,47.969 85.933,48.571 86.099,48.571 86.265,48.405 86.265,48.239 85.663,47.637 85.515,47.489 85.515,47.323 85.681,47.156 85.848,47.156 85.996,47.304 86.598,47.906 86.764,47.906 86.93,47.74 86.93,47.574 86.328,46.972 86.18,46.824 86.18,46.658 86.346,46.492 86.512,46.492 86.66,46.64 87.262,47.242 87.428,47.242 87.595,47.076 87.595,46.909 86.993,46.307 86.845,46.159 86.845,45.993 87.011,45.827 87.177,45.827 87.325,45.975 87.927,46.577 88.093,46.577 88.259,46.411 88.259,46.245 87.657,45.643 87.509,45.495 87.509,45.329 87.675,45.162 87.842,45.162 87.99,45.31 88.592,45.912 88.758,45.912 88.924,45.746 88.924,45.58 88.322,44.978 88.174,44.83 88.174,44.664 88.34,44.498 88.506,44.498 88.571,44.563 88.737,44.563 88.987,44.313 89.1,44.2 89.1,43.965 89.1,43.613 89.218,43.495 89.951,43.495 90.069,43.378 90.069,43.143 89.951,43.025 89.1,43.025 88.249,43.025 88.131,42.908 88.131,42.673 88.249,42.555 89.1,42.555 89.951,42.555 90.069,42.438 90.069,42.203 89.951,42.085 89.1,42.085 88.982,41.968 88.982,41.733 89.1,41.615 89.951,41.615 90.069,41.498 90.069,41.263 89.951,41.145 89.1,41.145 88.249,41.145 88.131,41.028 88.131,40.793 88.249,40.675 89.1,40.675 89.951,40.675 90.069,40.558 90.069,40.323 89.951,40.205 89.1,40.205 88.249,40.205 88.131,40.088 88.131,39.853 88.249,39.735 89.1,39.735 89.951,39.735 90.069,39.618 90.069,39.383 89.951,39.265 89.218,39.265 89.1,39.148 89.1,38.5 89.1,38 87.6,36.5 87.6,34 87.1,33.5 U33.75@87.1,29.175
USB3_D31: U1.AW18 U33.76 | length 62
  1_Top w0.1: U1.AW18@80.194,57.939 80.194,56.606 80.5,56.3 80.5,56.2
  1_Top w0.17: 80.5,56.2 80.5,51.6 81,51.1 81,49.9 82.7,48.2 82.783,48.117 82.949,48.117 83.489,48.657 83.655,48.657 83.821,48.49 83.821,48.324 83.199,47.701 82.576,47.079 82.576,46.913 82.742,46.746 82.908,46.746 83.531,47.369 84.154,47.992 84.32,47.992 84.486,47.826 84.486,47.66 83.863,47.037 83.24,46.414 83.24,46.248 83.407,46.082 83.573,46.082 84.196,46.704 84.818,47.327 84.984,47.327 85.151,47.161 85.151,46.995 84.528,46.372 83.905,45.749 83.905,45.583 84.071,45.417 84.237,45.417 84.86,46.04 85.483,46.663 85.649,46.663 85.815,46.496 85.815,46.33 85.193,45.707 84.57,45.085 84.57,44.919 84.736,44.752 84.902,44.752 85.525,45.375 86.148,45.998 86.314,45.998 86.48,45.832 86.48,45.666 85.857,45.043 85.234,44.42 85.234,44.254 85.401,44.088 85.567,44.088 86.19,44.71 86.812,45.333 86.978,45.333 87.145,45.167 87.145,45.001 86.522,44.378 85.899,43.755 85.899,43.589 86.065,43.423 86.232,43.423 86.854,44.046 87.477,44.668 87.643,44.668 87.809,44.502 87.809,44.336 87.27,43.797 87.27,43.63 87.519,43.381 87.6,43.3 87.6,43.065 87.6,42.713 87.482,42.595 86.719,42.595 86.602,42.478 86.602,42.243 86.719,42.125 87.6,42.125 88.481,42.125 88.598,42.008 88.598,41.773 88.481,41.655 87.6,41.655 86.992,41.655 86.875,41.538 86.875,41.303 86.992,41.185 87.482,41.185 87.6,41.068 87.6,39.6 87.6,38.3 86.8,37.5 86.8,34.9 86,34.1 86,29.4 86.225,29.175 U33.76@86.7,29.175
USB3_D_N: J22.2 U33.25 | length 19.3
  1_Top w0.15: U33.25@88.7,20.425 88.7,19.775 88.435,19.51 88.435,15.723 86.742,14.03 85.93,14.03 85.1,13.2 85.1,11 86.4,9.7 90.1,9.7 90.3,9.9 90.3,11.023 90.028,11.295 J22.2@89.4,11.295
USB3_D_P: J22.3 U33.23 | length 19.9
  1_Top w0.15: U33.23@87.9,20.425 87.9,19.775 88.165,19.51 88.165,15.835 86.63,14.3 85.818,14.3 84.909,13.391 84.83,13.312 84.83,10.888 84.909,10.809 86.288,9.43 88.288,9.43 88.309,9.409 88.33,9.43 90.17,9.43 90.191,9.409 90.6,9.818 90.6,10.3 91.205,10.905 91.205,11.1 J22.3@91.4,11.295
USB3_OE: U1.AP16 U33.13 | length 58.2
  1_Top w0.17: v1(77.7,62.4) 78.194,62.894 U1.AP16@78.194,62.939 ; v2(82.9,23.425) 84.709,23.425 84.884,23.6 U33.13@85.925,23.6
  5_int4_(sign) w0.1: v1(77.7,62.4) 77.8,62.4 78.3,61.9 78.3,55.524 79.65,54.174 79.65,46 81.03,44.62 81.03,39.67 79.87,38.51 79.87,38.04 79.87,37.94 79.97,37.84 80.95,37.84 81.05,37.74 81.05,37.54 80.95,37.44 79.87,37.44 79.824,37.44 79.724,37.34 79.724,37.14 79.824,37.04 79.87,37.04 80.95,37.04 81.05,36.94 81.05,36.74 80.95,36.64 79.87,36.64 79.824,36.64 79.724,36.54 79.724,36.34 79.824,36.24 79.87,36.24 80.95,36.24 81.05,36.14 81.05,35.94 80.95,35.84 79.87,35.84 79.824,35.84 79.724,35.74 79.724,35.54 79.824,35.44 79.87,35.44 80.95,35.44 81.05,35.34 81.05,35.14 80.95,35.04 79.87,35.04 79.824,35.04 79.724,34.94 79.724,34.74 79.824,34.64 79.87,34.64 80.95,34.64 81.05,34.54 81.05,34.34 80.95,34.24 79.97,34.24 79.87,34.14 79.87,33.62 79.87,25.83 82.25,23.45 82.875,23.45 v2(82.9,23.425)
USB3_RD: U1.AT17 U33.12 | length 65.5
  1_Top w0.17: v1(78.7,60.4) 78.7,60.445 U1.AT17@79.194,60.939 ; v2(83.5,24.025) 83.625,23.9 84.661,23.9 84.761,24 U33.12@85.925,24
  5_int4_(sign) w0.1: v1(78.7,60.4) 78.6,60.3 78.6,55.7 80.083,54.217 80.083,46.517 81.57,45.03 81.57,44.45 81.57,44.35 81.67,44.25 82.691,44.25 82.791,44.15 82.791,43.95 82.691,43.85 81.57,43.85 81.463,43.85 81.363,43.75 81.363,43.55 81.463,43.45 81.57,43.45 82.691,43.45 82.791,43.35 82.791,43.15 82.691,43.05 81.57,43.05 81.463,43.05 81.363,42.95 81.363,42.75 81.463,42.65 81.57,42.65 82.691,42.65 82.791,42.55 82.791,42.35 82.691,42.25 81.57,42.25 81.463,42.25 81.363,42.15 81.363,41.95 81.463,41.85 81.57,41.85 82.691,41.85 82.791,41.75 82.791,41.55 82.691,41.45 81.57,41.45 81.463,41.45 81.363,41.35 81.363,41.15 81.463,41.05 81.57,41.05 82.691,41.05 82.791,40.95 82.791,40.75 82.691,40.65 81.57,40.65 81.463,40.65 81.363,40.55 81.363,40.35 81.463,40.25 81.57,40.25 82.691,40.25 82.791,40.15 82.791,39.95 82.691,39.85 81.57,39.85 81.463,39.85 81.363,39.75 81.363,39.55 81.463,39.45 81.57,39.45 82.691,39.45 82.791,39.35 82.791,39.15 82.691,39.05 81.57,39.05 80.867,39.05 80.767,38.95 80.767,38.75 80.867,38.65 81.57,38.65 82.691,38.65 82.791,38.55 82.791,38.35 82.691,38.25 81.57,38.25 81.397,38.25 81.297,38.15 81.297,37.95 81.397,37.85 81.47,37.85 81.57,37.75 81.57,37.61 81.57,33.84 80.4,32.67 80.4,26 82.375,24.025 v2(83.5,24.025)
USB3_RESERVED: U1.AR16 U33.19 | length 58.5
  1_Top w0.17: v1(77.7,61.5) 77.755,61.5 U1.AR16@78.194,61.939 ; v2(85.1,20.525) 85.8,20.525 85.925,20.65 U33.19@85.925,21.2
  5_int4_(sign) w0.1: v1(77.7,61.5) 78,61.2 78,55.4 79.35,54.05 79.35,44.14 79.35,44.04 79.45,43.94 80.418,43.94 80.518,43.84 80.518,43.64 80.418,43.54 79.35,43.54 79.311,43.54 79.211,43.44 79.211,43.24 79.311,43.14 79.35,43.14 80.418,43.14 80.518,43.04 80.518,42.84 80.418,42.74 79.35,42.74 79.311,42.74 79.211,42.64 79.211,42.44 79.311,42.34 79.35,42.34 80.418,42.34 80.518,42.24 80.518,42.04 80.418,41.94 79.35,41.94 79.311,41.94 79.211,41.84 79.211,41.64 79.311,41.54 79.35,41.54 80.418,41.54 80.518,41.44 80.518,41.24 80.418,41.14 79.35,41.14 79.311,41.14 79.211,41.04 79.211,40.84 79.311,40.74 79.35,40.74 80.418,40.74 80.518,40.64 80.518,40.44 80.418,40.34 79.45,40.34 79.35,40.24 79.35,39.58 79.35,25.014 83.839,20.525 v2(85.1,20.525)
USB3_RXF: U1.AT18 U33.9 | length 64
  1_Top w0.17: v1(79.7,60.4) 79.7,60.55 80.089,60.939 U1.AT18@80.194,60.939 ; v2(83.5,25.325) 83.545,25.28 84.854,25.28 84.934,25.2 U33.9@85.925,25.2
  5_int4_(sign) w0.1: v1(79.7,60.4) 80.1,60 80.1,56.954 80,56.854 80,56.1 81.1,55 81.1,49.72 87.13,43.69 87.13,43.5 87.13,43.4 87.23,43.3 88.207,43.3 88.307,43.2 88.307,43 88.207,42.9 87.13,42.9 86.791,42.9 86.691,42.8 86.691,42.6 86.791,42.5 87.13,42.5 88.207,42.5 88.307,42.4 88.307,42.2 88.207,42.1 87.13,42.1 86.791,42.1 86.691,42 86.691,41.8 86.791,41.7 87.13,41.7 88.207,41.7 88.307,41.6 88.307,41.4 88.207,41.3 87.13,41.3 86.791,41.3 86.691,41.2 86.691,41 86.791,40.9 87.13,40.9 88.207,40.9 88.307,40.8 88.307,40.6 88.207,40.5 87.13,40.5 86.791,40.5 86.691,40.4 86.691,40.2 86.791,40.1 87.13,40.1 88.207,40.1 88.307,40 88.307,39.8 88.207,39.7 87.13,39.7 86.791,39.7 86.691,39.6 86.691,39.4 86.791,39.3 87.13,39.3 88.207,39.3 88.307,39.2 88.307,39 88.207,38.9 87.13,38.9 86.791,38.9 86.691,38.8 86.691,38.6 86.791,38.5 87.13,38.5 88.207,38.5 88.307,38.4 88.307,38.2 88.207,38.1 87.23,38.1 87.13,38 87.13,37.02 87.13,35.03 82.7,30.6 82.7,25.7 83.075,25.325 v2(83.5,25.325)
USB3_SIWU: U1.AN17 U33.10 | length 64.2
  1_Top w0.17: v1(78.745,63.445) 78.745,63.491 U1.AN17@79.194,63.939 ; v2(83,24.825) 84.193,24.825 84.278,24.91 84.701,24.91 84.811,24.8 U33.10@85.925,24.8
  5_int4_(sign) w0.1: v1(78.745,63.445) 78.755,63.445 79.3,62.9 79.3,57.878 79.525,57.653 79.525,57.072 79.3,56.847 79.3,56.2 80.7,54.8 80.7,48.02 85.09,43.63 85.09,43.43 85.09,43.33 85.19,43.23 86.244,43.23 86.344,43.13 86.344,42.93 86.244,42.83 85.09,42.83 84.864,42.83 84.764,42.73 84.764,42.53 84.864,42.43 85.09,42.43 86.244,42.43 86.344,42.33 86.344,42.13 86.244,42.03 85.09,42.03 84.864,42.03 84.764,41.93 84.764,41.73 84.864,41.63 85.09,41.63 86.244,41.63 86.344,41.53 86.344,41.33 86.244,41.23 85.09,41.23 84.864,41.23 84.764,41.13 84.764,40.93 84.864,40.83 85.09,40.83 86.244,40.83 86.344,40.73 86.344,40.53 86.244,40.43 85.09,40.43 84.864,40.43 84.764,40.33 84.764,40.13 84.864,40.03 85.09,40.03 86.244,40.03 86.344,39.93 86.344,39.73 86.244,39.63 85.09,39.63 84.864,39.63 84.764,39.53 84.764,39.33 84.864,39.23 85.09,39.23 86.244,39.23 86.344,39.13 86.344,38.93 86.244,38.83 85.19,38.83 85.09,38.73 85.09,38.51 85.09,34.75 81.6,31.26 81.6,26 82.775,24.825 v2(83,24.825)
USB3_SSRX_N: J22.8 U33.34 | length 26.4
  1_Top w0.15: v2(92.1,17.9) 92.365,18.165 92.365,19.71 92.3,19.775 U33.34@92.3,20.425
  16_Bottom w0.15: J22.8@88.4,12.795 88.095,13.1 87.5,13.1 87.348,12.948 87.348,12.748 88.4,11.695 88.4,9.5 89.6,8.3 94.1,8.3 94.63,8.83 94.63,10.63 95.7,11.7 95.7,14.5 94.07,16.13 92.974,16.13 92.328,16.776 92.328,17.672 v2(92.1,17.9)
USB3_SSRX_P: J22.9 U33.35 | length 26.4
  1_Top w0.15: U33.35@92.7,20.425 92.7,19.775 92.635,19.71 92.635,18.09 v2(92.825,17.9)
  16_Bottom w0.15: J22.9@86.4,12.795 86.918,12.795 88.13,11.583 88.13,9.388 89.488,8.03 94.212,8.03 94.282,8.1 94.9,8.718 94.9,10.518 95.891,11.509 95.97,11.588 95.97,14.612 95.891,14.691 94.182,16.4 93.086,16.4 92.598,16.888 92.598,17.673 v2(92.825,17.9)
USB3_SSTX_N: C560.2 J22.5 | length 1.7
  16_Bottom w0.15: C560.2@93.7,13.835 93.7,13.56 93.535,13.395 93.535,13.2 93.94,12.795 J22.5@94.4,12.795
USB3_SSTX_P: C561.2 J22.6 | length 1.7
  16_Bottom w0.15: J22.6@92.4,12.795 92.86,12.795 93.265,13.2 93.265,13.395 93.1,13.56 C561.2@93.1,13.835
USB3_TOD_N: C560.1 U33.31 | length 9.8
  1_Top w0.15: U33.31@91.1,20.425 91.1,19.775 91.165,19.71 91.165,15.153 92.388,13.93 93.312,13.93 93.9,14.518 v2(93.9,14.9)
  16_Bottom w0.15: C560.1@93.7,14.355 93.9,14.555 v2(93.9,14.9)
USB3_TOD_P: C561.1 U33.32 | length 9.4
  1_Top w0.15: U33.32@91.5,20.425 91.5,19.775 91.435,19.71 91.435,15.265 92.5,14.2 93.2,14.2 93.4,14.4 93.4,15 93.325,15.075 93.175,15.075 v2(93,14.9)
  16_Bottom w0.15: v2(93,14.9) 93.1,14.8 C561.1@93.1,14.355
USB3_TXE: U1.AR18 U33.8 | length 63.7
  1_Top w0.17: v1(79.7,61.5) 79.755,61.5 U1.AR18@80.194,61.939 ; v2(83.5,26.025) 83.871,25.654 85.039,25.654 85.093,25.6 U33.8@85.925,25.6
  5_int4_(sign) w0.1: v1(79.7,61.5) 80.3,60.9 80.3,56.7 81.4,55.6 81.4,50.23 83.16,48.47 84.06,48.47 89.9,42.63 89.9,42.5 89.9,42.4 90,42.3 90.96,42.3 91.06,42.2 91.06,42 90.96,41.9 89.9,41.9 88.84,41.9 88.74,41.8 88.74,41.6 88.84,41.5 89.9,41.5 90.96,41.5 91.06,41.4 91.06,41.2 90.96,41.1 89.9,41.1 88.84,41.1 88.74,41 88.74,40.8 88.84,40.7 89.9,40.7 90.96,40.7 91.06,40.6 91.06,40.4 90.96,40.3 89.9,40.3 88.84,40.3 88.74,40.2 88.74,40 88.84,39.9 89.9,39.9 90.96,39.9 91.06,39.8 91.06,39.6 90.96,39.5 89.9,39.5 88.84,39.5 88.74,39.4 88.74,39.2 88.84,39.1 89.8,39.1 89.9,39 89.9,38.75 89.9,35.35 83.5,28.95 v2(83.5,26.025)
USB3_VBUS: J22.1 U33.37 | length 24
  1_Top w0.2: U33.37@93.5,20.425 93.5,19.325 94.5,18.325 94.5,17.9 v2(94.6,17.8)
  7_int6_(sign) w0.3: J22.1@86.9,11.295 86.9,8.9 87.6,8.2 94.1,8.2 94.7,8.8 94.7,10.1 96.1,11.5 96.1,16.3 v2(94.6,17.8)
USB3_WAKEUP: U1.AV16 U33.16 | length 62.7
  1_Top w0.1: 77.769,57.939 77.769,58.569 78.139,58.939 U1.AV16@78.194,58.939
  1_Top w0.17: 77.769,57.939 77.769,57.763 77.6,57.594 77.6,56.4 78.1,55.9 78.1,50.6 75.4,47.9 75.4,40.3 79.5,36.2 79.5,29.77 79.5,29.562 79.618,29.445 80.207,29.445 80.325,29.327 80.325,29.092 80.207,28.975 79.5,28.975 78.846,28.975 78.729,28.857 78.729,28.622 78.846,28.505 79.5,28.505 80.364,28.505 80.481,28.387 80.481,28.152 80.364,28.035 79.5,28.035 78.846,28.035 78.729,27.917 78.729,27.682 78.846,27.565 79.5,27.565 80.364,27.565 80.481,27.447 80.481,27.212 80.364,27.095 79.618,27.095 79.5,26.977 79.5,26.625 79.5,26.39 79.5,26.132 79.618,26.015 80.364,26.015 80.481,25.897 80.481,25.662 80.364,25.545 79.5,25.545 78.846,25.545 78.729,25.427 78.729,25.192 78.846,25.075 79.5,25.075 80.364,25.075 80.481,24.957 80.481,24.722 80.364,24.605 79.618,24.605 79.5,24.487 79.5,24.135 79.5,23.9 79.706,23.694 79.872,23.694 80.165,23.986 80.331,23.986 80.497,23.82 80.497,23.654 80.121,23.279 79.278,22.435 79.278,22.269 79.445,22.103 79.611,22.103 80.371,22.863 80.537,22.863 80.62,22.78 82,21.4 84.6,21.4 85.115,21.915 85.115,22.327 85.188,22.4 U33.16@85.925,22.4
USB3_WR: U1.AR17 U33.11 | length 65.1
  1_Top w0.17: v1(78.7,61.5) 78.755,61.5 U1.AR17@79.194,61.939 ; v2(84.5,24.425) 84.525,24.4 U33.11@85.925,24.4
  5_int4_(sign) w0.1: v1(78.7,61.5) 78.8,61.5 79.1,61.2 79.1,57.795 79.325,57.57 79.325,57.155 79.095,56.925 79.071,56.925 79,56.854 79,55.9 80.383,54.517 80.383,47.017 83.21,44.19 83.21,43.81 83.21,43.71 83.31,43.61 84.364,43.61 84.464,43.51 84.464,43.31 84.364,43.21 83.21,43.21 83.189,43.21 83.089,43.11 83.089,42.91 83.189,42.81 83.21,42.81 84.364,42.81 84.464,42.71 84.464,42.51 84.364,42.41 83.21,42.41 83.189,42.41 83.089,42.31 83.089,42.11 83.189,42.01 83.21,42.01 84.364,42.01 84.464,41.91 84.464,41.71 84.364,41.61 83.21,41.61 83.189,41.61 83.089,41.51 83.089,41.31 83.189,41.21 83.21,41.21 84.364,41.21 84.464,41.11 84.464,40.91 84.364,40.81 83.21,40.81 83.189,40.81 83.089,40.71 83.089,40.51 83.189,40.41 83.21,40.41 84.364,40.41 84.464,40.31 84.464,40.11 84.364,40.01 83.21,40.01 83.189,40.01 83.089,39.91 83.089,39.71 83.189,39.61 83.21,39.61 84.364,39.61 84.464,39.51 84.464,39.31 84.364,39.21 83.21,39.21 83.189,39.21 83.089,39.11 83.089,38.91 83.189,38.81 83.21,38.81 84.364,38.81 84.464,38.71 84.464,38.51 84.364,38.41 83.31,38.41 83.21,38.31 83.21,38.22 83.21,37.41 82.19,36.39 82.19,36.12 82.19,36.02 82.29,35.92 83.344,35.92 83.444,35.82 83.444,35.62 83.344,35.52 82.19,35.52 81.97,35.52 81.87,35.42 81.87,35.22 81.97,35.12 82.09,35.12 82.19,35.02 82.19,34.85 82.19,33.33 81.1,32.24 81.1,25.9 82.625,24.375 83.186,24.375 83.311,24.5 84.425,24.5 v2(84.5,24.425)
VCCIO_HPS: C464.2 R326.2 U1.M16 | length 2.1
  1_Top w0.3: v1(77.7,85.375) 78.136,84.939 U1.M16@78.194,84.939
  16_Bottom w0.3: v1(77.7,85.375) 77.935,85.14 C464.2@78.175,85.14 78.59,85.14 R326.2@78.925,85.475
VCCIOREF_HPS: C480.2 R327.2 U1.N16 | length 2.3
  1_Top w0.3: v1(77.7,84.375) 78.136,83.939 U1.N16@78.194,83.939
  16_Bottom w0.3: R327.2@77.025,83.8 77.215,83.99 77.615,83.99 ; v1(77.7,84.375) 77.7,84.075 77.615,83.99 ; C480.2@78.175,83.99 77.615,83.99
VDD33_1: R147.2 R148.2 U10.J7 | length 10.7
  1_Top w0.3: v3(146.44,75.385) U10.J7@147.075,76.02
  16_Bottom w0.3: v3(146.44,75.385) 147,75.945 R148.2@147.365,75.945 148.09,75.945 148.29,76.145 148.29,77.626 148.34,77.676 148.34,78.215 148.29,78.264 148.29,79.81 ; R147.2@146.84,82.445 R147.2@146.89,82.395 ; R147.2@146.89,82.395 146.89,82.42 147.055,82.255 148.139,82.255 148.31,82.085 148.31,81.546 148.31,80.246 148.31,79.83
VDD33_2: R158.2 R159.2 R160.2 R161.2 R162.2 R164.2 R165.2 U23.J7 | length 20.2
  1_Top w0.3: U23.J7@144.575,144.935 v3(145.21,144.3)
  16_Bottom w0.3: R158.2@137.3,141.075 137.3,142.276 137.309,142.285 ; R161.2@138.15,142.3 138.135,142.285 137.309,142.285 ; R162.2@140.85,145.025 140.85,146.05 140.95,146.15 ; v3(145.21,144.3) 144.65,144.86 R165.2@144.65,145.225 144.65,145.95 144.45,146.15 142.969,146.15 142.919,146.2 142.38,146.2 142.331,146.15 140.95,146.15 ; 136.05,143.896 136.05,143.925 136.225,144.1 136.254,144.1 ; 136.05,143.896 136.254,144.1 ; 136.05,143.896 136,143.846 136,142.745 136.46,142.285 137.309,142.285 ; 136.254,144.1 136.499,144.345 137.431,144.345 137.676,144.1 R159.2@138.05,144.1 138.175,144.225 138.175,144.75 R164.2@138.35,144.925 138.207,145.068 138.207,146.057 138.482,146.332 139.126,146.332 139.288,146.17 140.93,146.17 140.95,146.15